# Altium PCB HSS_2026_PCB.PcbDoc (part 3 of 3)
Units mil, origin at the board's own origin, x right, y up, seen from the top; angles counter-clockwise.
Board outline 3937.01 x 3937.01 mil, 4 copper layers (SIG_1/POW, GND, PWR, SIG_2/GND), stack 22.334 mil thick; 289 components, 169 nets, 827 pads, 358 vias.
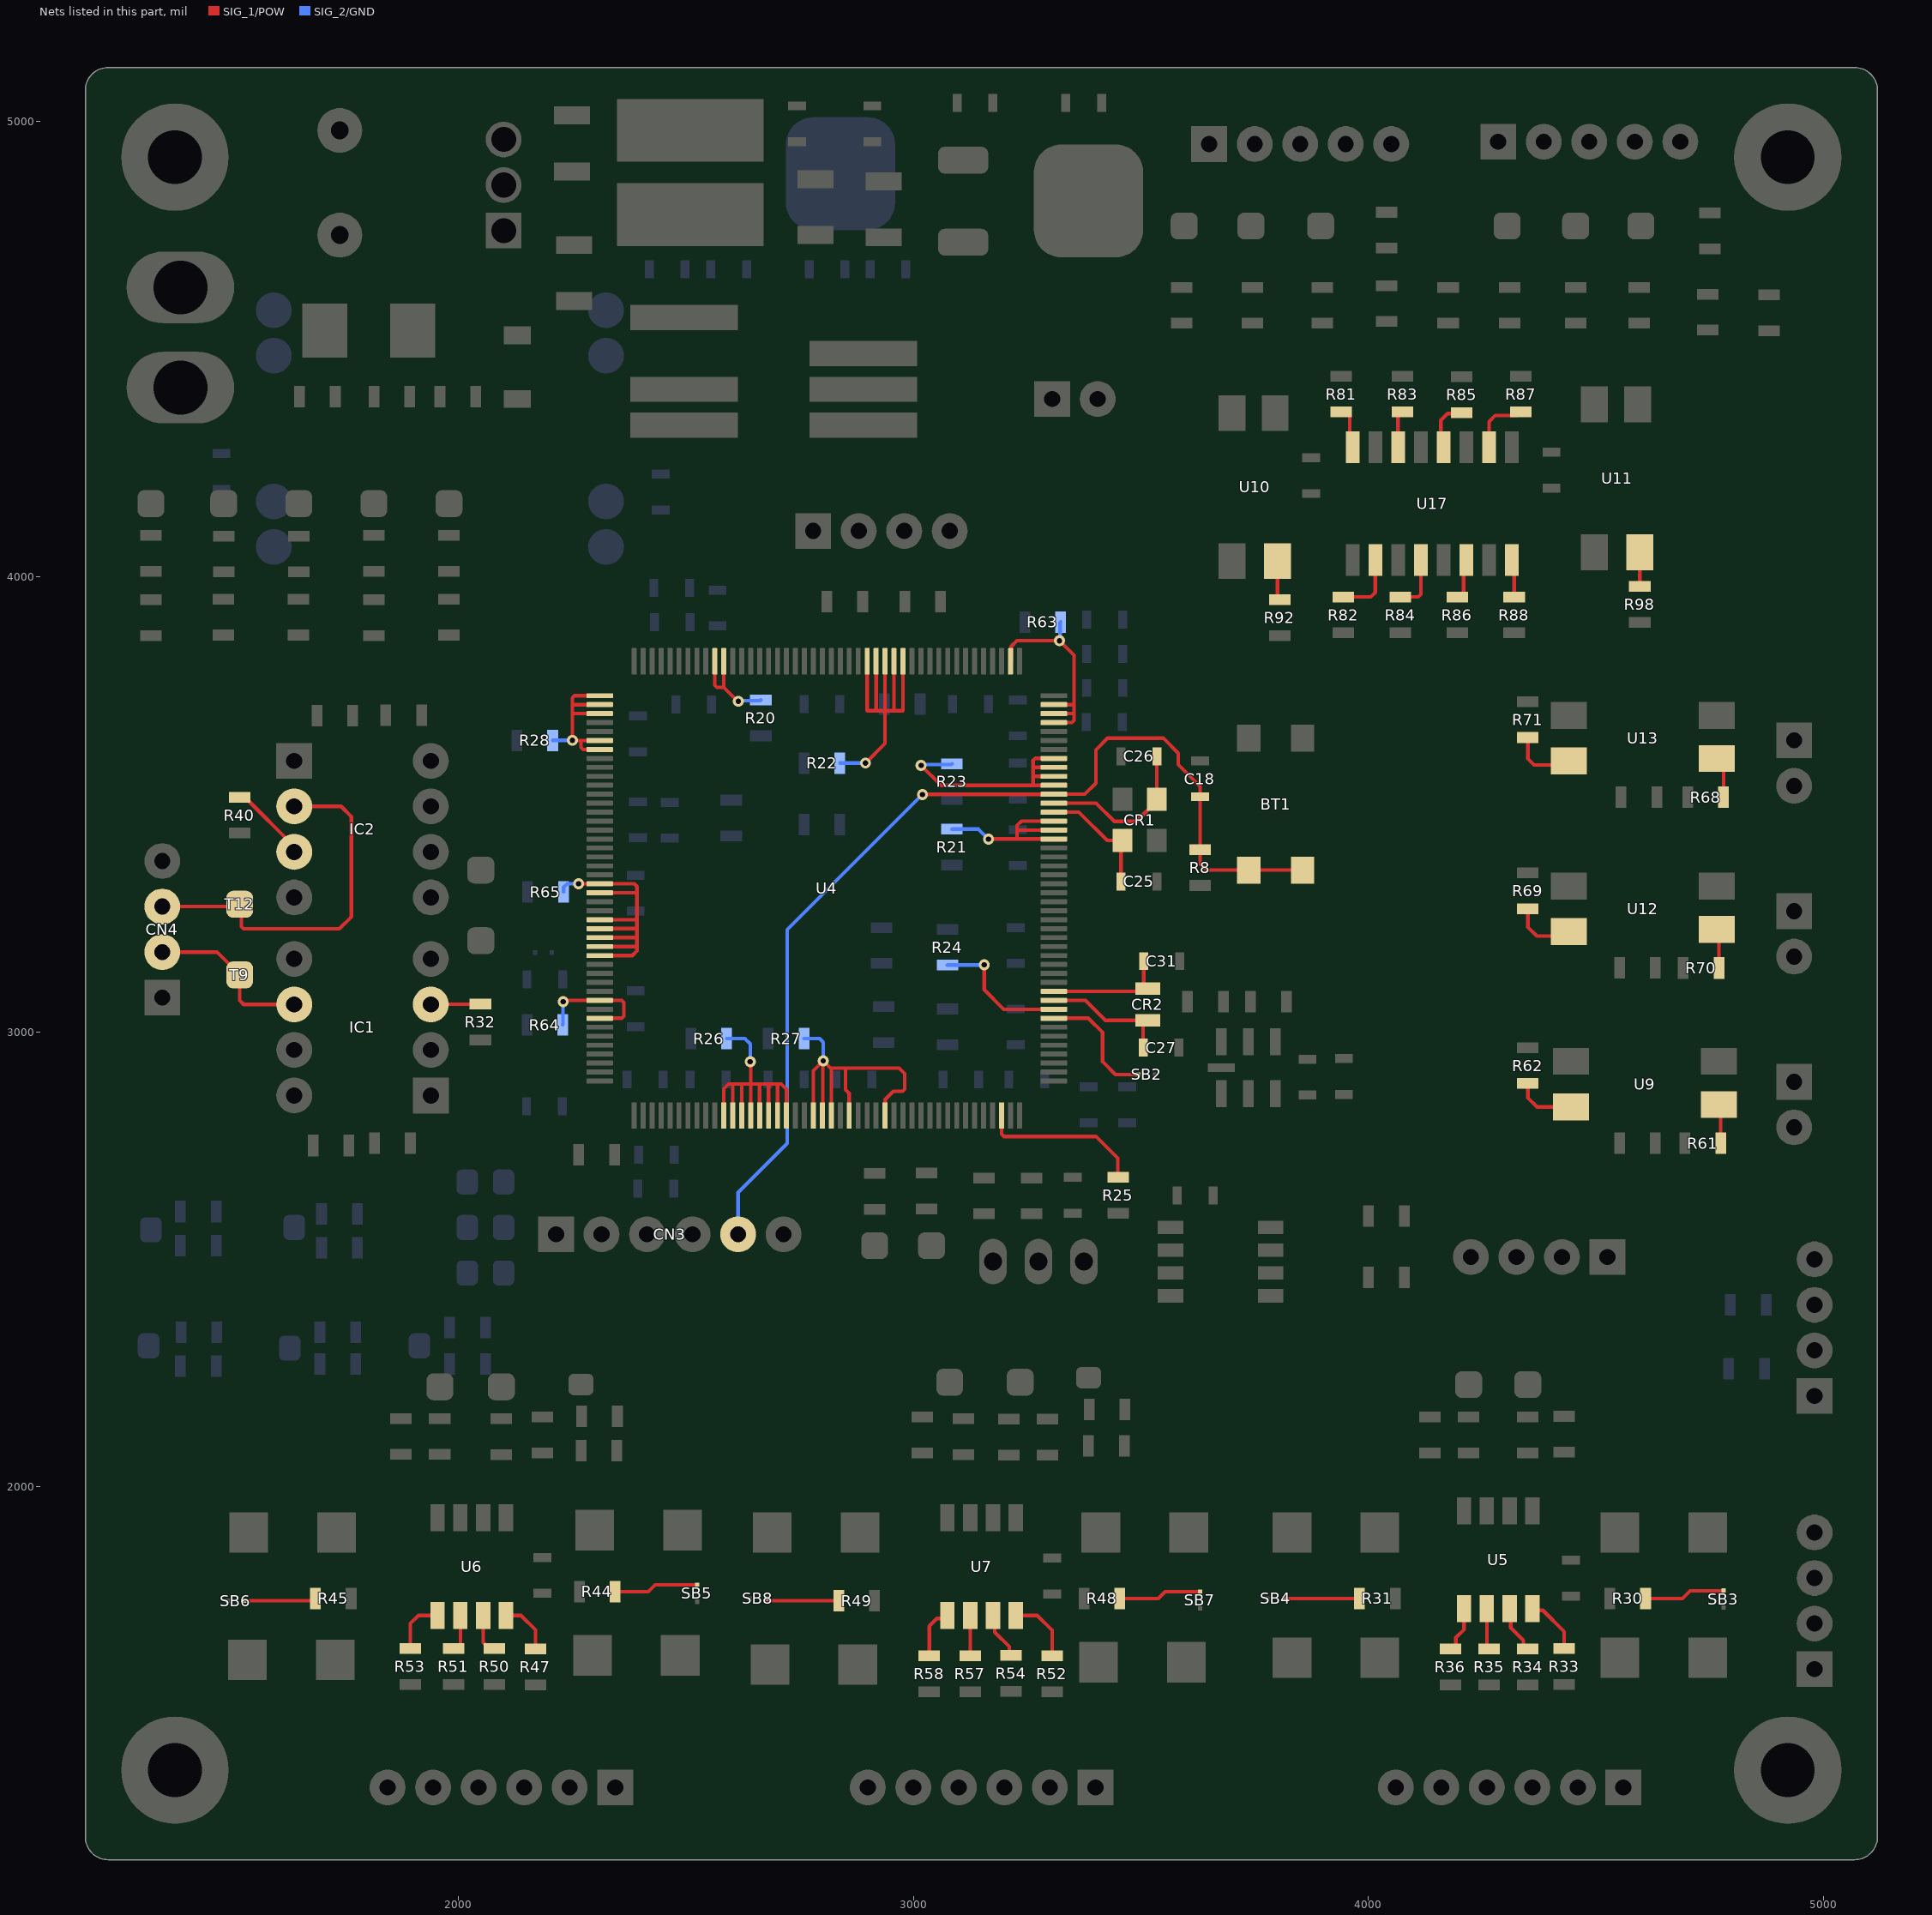
[diagram p5: the nets of this part, all layers, seen from the top]

## Via types
v1: diameter 24, hole 12, SIG_1/POW to SIG_2/GND, tented both sides, 358 vias

## Nets (pads, with @x,y where several pads share a name; then routed paths per layer and width w, separated by ;. In a path a pad name is that pad's centre, name@x,y a point inside that pad or via, vN(x,y) a via of type N, cw(c..) or ccw(c..) an arc to the next point about the centre after c; other vN are vias at no path point) (continued)
NetR20_2: R20.2 U4.78 U4.79 | length 226.9
  SIG_1/POW w8: U4.79@2563.94,3813.82 2563.94,3761.06 2568.62,3756.38 2583.62,3756.38 ; U4.78@2583.62,3813.82 2583.62,3756.38 ; v1(2615.58,3726) 2614,3726 2583.62,3756.38
  SIG_2/GND w8: v1(2615.58,3726) 2616.95,3727.37 2663.63,3727.37 R20.2@2665,3728.74
NetR21_2: R21.2 U4.28 U4.29 U4.30 | length 430.5
  SIG_1/POW w8: v1@3165,3423 v1(3165.13,3423.13) 3165.27,3423.27 3228,3423.27 ; U4.28@3308.82,3423.27 3228,3423.27 ; U4.29@3308.82,3442.95 3232.82,3442.95 3228,3438.13 ; U4.30@3308.82,3462.64 3237.64,3462.64 3228,3453 3228,3438.13 ; 3228,3423.27 3228,3438.13
  SIG_2/GND w8: R21.2@3085,3445 3143.27,3445 v1(3165.13,3423.13)
NetR22_2: R22.2 U4.58 U4.59 U4.60 U4.61 U4.62 | length 811.9
  SIG_1/POW w8: v1(2895,3590) 2937.95,3632.95 2937.95,3705 ; U4.62@2898.58,3813.82 2898.58,3705 2918.27,3705 ; U4.61@2918.27,3813.82 2918.27,3705 ; U4.60@2937.95,3813.82 2937.95,3705 ; U4.59@2957.64,3813.82 2957.64,3705 ; U4.58@2977.32,3813.82 2977.32,3705 2957.64,3705 ; 2918.27,3705 2937.95,3705 ; 2937.95,3705 2957.64,3705
  SIG_2/GND w8: R22.2@2838.74,3590 v1(2895,3590)
NetR23_2: R23.2 U4.34 U4.35 U4.36 U4.37 | length 575.2
  SIG_1/POW w8: v1(3017,3585) 3060.62,3541.38 3262,3541.38 ; U4.34@3308.82,3541.38 3262,3541.38 ; U4.35@3308.82,3561.06 3264.06,3561.06 3263,3560 ; U4.36@3308.82,3580.75 3265.87,3580.75 3263,3577.87 ; U4.37@3308.82,3600.43 3267.69,3600.43 3263,3595.75 3263,3577.87 ; 3262,3541.38 3263,3542.38 3263,3560 ; 3263,3560 3263,3577.87
  SIG_2/GND w8: v1(3017,3585) 3018.87,3586.87 3083.13,3586.87 R23.2@3085,3588.74
NetR24_2: R24.2 U4.9 | length 306.8
  SIG_1/POW w8: v1(3156,3147) 3156,3092 3198.75,3049.25 U4.9@3308.82,3049.25
  SIG_2/GND w8: R24.2@3075,3146.26 3075.37,3146.63 3155.63,3146.63 v1(3156,3147)
NetR25_2: R25.2 U4.174 | length 360.6
  SIG_1/POW w8: U4.174@3193.86,2816.18 3193.86,2775.14 3199,2770 3401,2770 3449,2722 3449,2681 R25.2@3450,2680
NetR26_2: R26.2 U4.143 U4.144 U4.145 U4.146 U4.147 U4.148 U4.149 U4.150 | length 824.3
  SIG_1/POW w8: U4.143@2583.62,2816.18 2583.62,2874.62 2594,2885 2603,2885 ; U4.144@2603.31,2816.18 2603.31,2884.69 2603,2885 ; U4.145@2622.99,2816.18 2622.99,2884.85 2622.84,2885 ; v1@2642,2934 2642.68,2933.32 2642.68,2885 ; U4.146@2642.68,2816.18 2642.68,2885 ; U4.147@2662.36,2816.18 2662.36,2884.36 2663,2885 ; U4.148@2682.05,2816.18 2682.05,2880.55 2686.5,2885 ; U4.149@2701.73,2816.18 2701.73,2881.52 2698.25,2885 ; U4.150@2721.42,2816.18 2721.42,2873.58 2710,2885 2698.25,2885 ; 2603,2885 2622.84,2885 ; 2622.84,2885 2642.68,2885 ; 2642.68,2885 2663,2885 ; 2663,2885 2686.5,2885 ; 2686.5,2885 2698.25,2885
  SIG_2/GND w8: R26.2@2590,2985 2630,2985 2641.79,2973.21 v1(2641.79,2934.21)
NetR27_2: R27.2 U4.153 U4.154 U4.155 U4.157 U4.161 | length 858.3
  SIG_1/POW w8: U4.153@2780.47,2816.18 2780.47,2914.47 v1@2801.08,2935.08 ; U4.154@2800.16,2816.18 2801.08,2817.1 v1@2801.08,2935.08 ; U4.155@2819.84,2816.18 2819.84,2918.16 2818,2920 ; U4.157@2859.21,2816.18 2859.21,2864.29 2850.9,2872.6 2850.9,2920 ; U4.161@2937.95,2816.18 2938.13,2816.35 2938.13,2851.13 2956,2869 2976.31,2869 2981,2873.69 2981,2908 2969,2920 2850.9,2920 ; v1@2801.08,2935.08 v1(2802,2936) 2818,2920 ; 2818,2920 2850.9,2920
  SIG_2/GND w8: R27.2@2760,2985 2794,2985 2802,2977 v1(2802,2936)
NetR28_2: R28.2 U4.89 U4.90 U4.91 U4.94 U4.95 | length 439.8
  SIG_1/POW w8: v1(2251,3640) v1@2251.2,3639.8 ; U4.95@2311.18,3620.12 2274.69,3620.12 2270,3624.8 2270,3638.8 2269,3639.8 ; U4.94@2311.18,3639.8 2269,3639.8 ; U4.91@2311.18,3698.86 2253.06,3698.86 2251.2,3697 ; U4.90@2311.18,3718.54 2254.47,3718.54 2251.2,3715.27 ; U4.89@2311.18,3738.23 2255.88,3738.23 2251.2,3733.54 2251.2,3715.27 ; v1@2251.2,3639.8 2251.2,3697 ; v1@2251.2,3639.8 2269,3639.8 ; 2251.2,3697 2251.2,3715.27
  SIG_2/GND w8: R28.2@2207.74,3640 v1(2251,3640)
NetR30_1: R30.1 SB3.2 | length 178.3
  SIG_1/POW w8: R30.1@4608.74,1755 4689.78,1755 4706.78,1772 SB3.2@4780,1772
NetR31_1: R31.1 SB4.2 | length 165
  SIG_1/POW w8: SB4.2@3815,1755 R31.1@3980,1755
NetR32_2: IC1.3 R32.2 | length 109.3
  SIG_1/POW w8: IC1.3@1940,3060 1940.37,3060.37 2048.63,3060.37 R32.2@2049,3060.74
NetR33_2: R33.2 U5.8 | length 128
  SIG_1/POW w8: U5.8@4360,1732.75 4363.81,1728.94 4383.06,1728.94 4430,1682 R33.2@4430,1645
NetR34_2: R34.2 U5.7 | length 106.8
  SIG_1/POW w8: U5.7@4310,1732.75 4312.53,1730.22 4312.53,1690.47 4340.14,1662.86 4340.14,1651.55 4347.95,1643.74 R34.2@4350,1643.74
NetR35_2: R35.2 U5.6 | length 91.1
  SIG_1/POW w8: U5.6@4260,1732.75 4260,1648.74 R35.2@4265,1643.74
NetR36_2: R36.2 U5.5 | length 103.8
  SIG_1/POW w8: R36.2@4180,1643.74 4184,1643.74 4191.81,1651.55 4191.81,1669 4210,1687.19 U5.5@4210,1732.75
NetR40_2: IC2.3 R40.2 | length 176.6
  SIG_1/POW w8: R40.2@1520,3515 1531.81,3515 1640,3406.81 IC2.3@1640,3395
NetR44_1: R44.1 SB5.2 | length 186.2
  SIG_1/POW w8: R44.1@2345,1770 2418,1770 2433,1785 SB5.2@2525,1785
NetR45_1: R45.1 SB6.2 | length 158.3
  SIG_1/POW w8: SB6.2@1530,1750 1681.26,1750 R45.1@1686.26,1755
NetR47_2: R47.2 U6.8 | length 120.4
  SIG_1/POW w8: U6.8@2105,1717.75 2138.25,1717.75 2170,1686 R47.2@2170,1643.74
NetR48_1: R48.1 SB7.2 | length 182.5
  SIG_1/POW w8: R48.1@3453.74,1755 3538.28,1755 3553.28,1770 SB7.2@3630,1770
NetR49_1: R49.1 SB8.2 | length 161.3
  SIG_1/POW w8: SB8.2@2677,1755 2682,1750 R49.1@2836.26,1750
NetR50_2: R50.2 U6.7 | length 90
  SIG_1/POW w8: U6.7@2055,1717.75 2055,1658.19 2068.19,1645 R50.2@2080,1645
NetR51_2: R51.2 U6.6 | length 83.2
  SIG_1/POW w8: R51.2@1990,1645 1997.19,1645 2005,1652.81 U6.6@2005,1717.75
NetR52_2: R52.2 U7.8 | length 149.8
  SIG_1/POW w8: U7.8@3225,1717.75 3272.25,1717.75 3305,1685 R52.2@3305,1628.74
NetR53_2: R53.2 U6.5 | length 122.4
  SIG_1/POW w8: R53.2@1895,1645 1895,1700 1912.75,1717.75 U6.5@1955,1717.75
NetR54_2: R54.2 U7.7 | length 104.3
  SIG_1/POW w8: U7.7@3175,1717.75 3179.09,1713.66 3179.09,1680.91 3210.88,1649.12 3210.88,1634.12 R54.2@3215,1630
NetR57_2: R57.2 U7.6 | length 89
  SIG_1/POW w8: R57.2@3125,1628.74 U7.6@3125,1717.75
NetR58_2: R58.2 U7.5 | length 115.1
  SIG_1/POW w8: R58.2@3035,1628.74 3035,1694 3051.94,1710.94 3068.19,1710.94 U7.5@3075,1717.75
NetR61_1: R61.1 U9.3 | length 86.5
  SIG_1/POW w8: U9.3@4770,2840 4773.74,2836.26 R61.1@4773.74,2755
NetR62_2: R62.2 U9.2 | length 134.5
  SIG_1/POW w8: R62.2@4350,2886.26 4350,2855 4370,2835 U9.2@4445,2835
NetR63_2: R63.2 U4.41 U4.42 U4.43 U4.46 | length 510.1
  SIG_1/POW w8: U4.46@3213.54,3813.82 3215.06,3815.33 3215.06,3846.48 3227.57,3859 v1(3321,3859) 3353,3827 3353,3720 ; U4.41@3308.82,3679.17 3348.31,3679.17 3353,3683.86 3353,3699 ; U4.42@3308.82,3698.86 3352.86,3698.86 3353,3699 ; U4.43@3308.82,3718.54 3351.54,3718.54 3353,3720 ; 3353,3699 3353,3720
  SIG_2/GND w8: v1(3321,3859) 3322.37,3860.37 3322.37,3898.63 R63.2@3323.74,3900
NetR64_2: R64.2 U4.123 U4.125 | length 272.4
  SIG_1/POW w8: v1(2231,3066) 2233.76,3068.76 2311.01,3068.76 2311.24,3069 2359.31,3069 2364,3064.31 2364,3034.25 2359.31,3029.57 U4.125@2311.18,3029.57
  SIG_2/GND w8: R64.2@2230,3015 2230.5,3015.5 2230.5,3065.5 v1(2231,3066)
NetR65_2: R65.2 U4.110 U4.111 U4.114 U4.115 U4.116 U4.117 U4.118 | length 814.1
  SIG_1/POW w8: v1@2265,3325 2265.16,3324.84 U4.110@2311.18,3324.84 2387.13,3324.84 2393,3319 2393,3305 ; U4.118@2311.18,3167.36 2382.36,3167.36 2393,3178 2393,3187 ; U4.117@2311.18,3187.05 2392.95,3187.05 2393,3187 ; U4.116@2311.18,3206.73 2392.73,3206.73 2393,3207 ; U4.115@2311.18,3226.42 2392.58,3226.42 2393,3226 ; U4.114@2311.18,3246.1 2392.9,3246.1 2393,3246 ; U4.111@2311.34,3305 U4.111@2311.18,3305.16 2392.84,3305.16 2393,3305 ; 2393,3187 2393,3207 ; 2393,3207 2393,3226 ; 2393,3226 2393,3246 ; 2393,3246 2393,3305
  SIG_2/GND w8: R65.2@2231.74,3307 2231.74,3317.32 2239.55,3325.13 v1(2264.87,3325.13)
NetR68_1: R68.1 U13.3 | length 91.2
  SIG_1/POW w8: U13.3@4765,3600 4780,3585 R68.1@4780,3515
NetR69_1: R69.1 U12.2 | length 142.4
  SIG_1/POW w8: R69.1@4350,3270 4350,3230 4370,3210 4430,3210 U12.2@4440,3220
NetR70_1: R70.1 U12.3 | length 87.1
  SIG_1/POW w8: U12.3@4765,3225 4770,3220 R70.1@4770,3140
NetR71_1: R71.1 U13.2 | length 145.8
  SIG_1/POW w8: R71.1@4350,3646.26 4350,3600 4364,3586 4431,3586 U13.2@4440,3595
NetR81_1: R81.1 U17.16 | length 94.2
  SIG_1/POW w8: R81.1@3940,4361.26 3951.19,4361.26 3959,4353.45 3959,4290 U17.16@3965,4284
NetR82_2: R82.2 U17.2 | length 145.1
  SIG_1/POW w8: R82.2@3945,3955 4005,3955 4015,3965 U17.2@4015,4036
NetR83_1: R83.1 U17.14 | length 82.7
  SIG_1/POW w8: U17.14@4065,4284 4065,4353.45 4072.81,4361.26 R83.1@4075,4361.26
NetR84_2: R84.2 U17.4 | length 122.5
  SIG_1/POW w8: R84.2@4070,3955 4109,3955 4115,3961 U17.4@4115,4036
NetR85_1: R85.1 U17.12 | length 114.5
  SIG_1/POW w8: U17.12@4165,4284 4159,4290 4159,4343 4174.06,4358.06 4203.06,4358.06 R85.1@4205,4360
NetR86_2: R86.2 U17.6 | length 92.9
  SIG_1/POW w8: R86.2@4195,3955 4201.19,3955 4209,3962.81 4209,4030 U17.6@4215,4036
NetR87_1: R87.1 U17.10 | length 134.8
  SIG_1/POW w8: U17.10@4265,4284 4265,4340 4278.45,4353.45 4327.19,4353.45 R87.1@4335,4361.26
NetR88_2: R88.2 U17.8 | length 83.1
  SIG_1/POW w8: U17.8@4315,4036 4320,4031 R88.2@4320,3955
NetR92_2: R92.2 U10.2 | length 87.1
  SIG_1/POW w8: U10.2@3800,4034 3800,3954 R92.2@3805,3949
NetR98_2: R98.2 U11.2 | length 75
  SIG_1/POW w8: R98.2@4596,3978 U11.2@4596,4053
NetSB2_2: SB2.2 U4.8 | length 274
  SIG_1/POW w8: U4.8@3308.82,3029.57 3308.99,3029.74 3384.26,3029.74 3416,2998 3416,2934 3444,2906 SB2.2@3494,2906
NRST: BT1.1 BT1.4 C18.2 CN3.5 R8.1 U4.33 | length 2297.2
  SIG_1/POW w8: v1(3020,3521) 3020.52,3521.52 3308.65,3521.52 U4.33@3308.82,3521.69 3376.69,3521.69 3401,3546 3401,3619 3427,3645 3549,3645 3582,3612 3582,3587 3630,3539 C18.2@3630,3516.26 R8.1@3630,3400 3630,3369 3644,3355 BT1.1@3736.89,3355 BT1.4@3855,3355
  SIG_2/GND w8: CN3.5@2615,2555 2615,2646.77 2723,2754.77 2723,3224 v1(3020,3521)
PC14-OSC32_IN: C27.1 CR2.2 U4.10 | length 288.2
  SIG_1/POW w8: U4.10@3308.82,3068.94 3378.06,3068.94 3422,3025 3514.78,3025 3505,3015.22 C27.1@3505,2965
PC15-OSC32_OUT: C31.1 CR2.1 U4.11 | length 272.4
  SIG_1/POW w8: U4.11@3308.82,3088.62 3508.62,3088.62 CR2.1@3515,3095 3506.26,3103.74 C31.1@3506.26,3155
PH0-OSC_IN: C25.2 CR1.3 U4.31 | length 267
  SIG_1/POW w8: U4.31@3308.82,3482.32 3363.68,3482.32 3426,3420 CR1.3@3460,3420 ; C25.2@3456.26,3330 CR1.3@3456.26,3420
PH1-OSC_OUT: C26.2 CR1.1 U4.32 | length 359.5
  SIG_1/POW w8: U4.32@3308.82,3502.01 3401.5,3502.01 3441.51,3462 3490.19,3462 3535,3506.81 C26.2@3535,3605
YKK_RX: CN4.2 IC1.6 T9.1 | length 370.4
  SIG_1/POW w8: CN4.2@1350,3175 1470,3175 T9.1@1520,3125 1520,3069 1529,3060 IC1.6@1640,3060
YKK_TX: CN4.3 IC2.2 T12.1 | length 832.4
  SIG_1/POW w8: CN4.3@1350,3275 1515,3275 T12.1@1520,3280 1524,3276 1524,3230.69 1528.69,3226 1739,3226 1765.69,3252.69 1765.69,3472.31 1743,3495 IC2.2@1640,3495
pads on no net: IC1.1 IC1.4 IC2.1 IC2.4 U1.4 U1.5 U4.15 U15.1 U15.4 VD1.1 VD2.1 VD3.1 VD4.1

## Polygon pours and split planes (outlines as drawn)
GND_I on SIG_2/GND "GND_I_L04_P001" (solid, pour order 1): 1230,5068.11 5066,5068.11 5066,1211 1230,1211
+3.3V_I on SIG_1/POW "+3.3V_I_L01_P000" (solid, pour order 0): 1227,5068.11 5063,5068.11 5063,1211 1227,1211
+3.3V_I on PWR (split plane): 5072.8,5097.73 5077.38,5096.63 5081.73,5094.83 5085.74,5092.37 5089.32,5089.32 5092.37,5085.74 5094.83,5081.73 5096.63,5077.38 5097.73,5072.8 5098.06,5068.61 5098.01,5068.11 5098.01,1231.1 5098.06,1230.6 5097.73,1226.41 5096.63,1221.83 5094.83,1217.49 5092.37,1213.47 5089.32,1209.89 5085.74,1206.84 5081.73,1204.38 5077.38,1202.58 5072.8,1201.48 5068.61,1201.15 5068.11,1201.2 1231.1,1201.2 1230.6,1201.15 1226.41,1201.48 1221.83,1202.58 1217.49,1204.38 1213.47,1206.84 1209.89,1209.89 1206.84,1213.47 1204.38,1217.49 1202.58,1221.83 1201.48,1226.41 1201.15,1230.6 1201.2,1231.1 1201.2,5068.11 1201.15,5068.61 1201.48,5072.8 1202.58,5077.38 1204.38,5081.73 1206.84,5085.74 1209.89,5089.32 1213.47,5092.37 1217.49,5094.83 1221.83,5096.63 1226.41,5097.73 1230.6,5098.06 1231.1,5098.01 5068.11,5098.01 5068.61,5098.06
NetC1_1 on PWR (split plane): 1854.9,5027.89 1854.9,4677.11 1796.4,4618.6 1795.29,4616.95 1794.9,4615 1794.9,4472.11 1777.89,4455.1 1632.11,4455.1 1563.6,4523.6 1561.95,4524.71 1560,4525.1 1272.11,4525.1 1225.1,4572.11 1225.1,4697.89 1282.11,4754.9 1515,4754.9 1516.95,4755.29 1518.6,4756.4 1558.6,4796.4 1559.71,4798.05 1560.1,4800 1560.1,4997.89 1642.11,5079.9 1802.89,5079.9
+24V on PWR (split plane): 2467.9,4933 2467.9,4837.11 2263.4,4632.6 2262.29,4630.95 2261.9,4629 2261.9,4375.11 2122.89,4236.1 1576,4236.1 1574.05,4235.71 1572.4,4234.6 1503.89,4166.1 1466,4166.1 1464.05,4165.71 1462.4,4164.6 1423.4,4125.6 1422.29,4123.95 1421.9,4122 1421.9,4092.11 1386.89,4057.1 1260.11,4057.1 1225.1,4092.11 1225.1,4557.69 1266.4,4516.4 1268.05,4515.29 1270,4514.9 1503.9,4514.9 1503.9,4319 1504.29,4317.05 1505.4,4315.4 1531.4,4289.4 1533.05,4288.29 1535,4287.9 2001,4287.9 2002.95,4288.29 2004.6,4289.4 2031.6,4316.4 2032.71,4318.05 2033.1,4320 2033.1,4783.89 2055.11,4805.9 2157,4805.9 2158.95,4806.29 2160.6,4807.4 2187.6,4834.4 2188.71,4836.05 2189.1,4838 2189.1,4869 2188.71,4870.95 2187.6,4872.6 2144.6,4915.6 2142.95,4916.71 2141,4917.1 1865.1,4917.1 1865.1,5030 1864.71,5031.95 1863.6,5033.6 1817.31,5079.9 2467.9,5079.9
+5V_I on PWR (split plane): 2689.4,4511.4 2691.05,4510.29 2693,4509.9 3030.89,4509.9 3304.9,4235.89 3304.9,4052.11 3221.89,3969.1 2043,3969.1 2041.05,3968.71 2039.39,3967.6 1999.4,3927.6 1998.29,3925.95 1997.9,3924 1997.9,2666 1998.29,2664.05 1999.4,2662.4 2132.9,2528.89 2132.9,2417 2133.29,2415.05 2134.4,2413.4 2246.4,2301.4 2248.05,2300.29 2250,2299.9 3379,2299.9 3380.95,2300.29 3382.6,2301.4 3498.6,2417.4 3499.71,2419.05 3500.1,2421 3500.1,2670.89 3538.11,2708.9 3711.89,2708.9 3764.9,2655.89 3764.9,2420 3765.29,2418.05 3766.4,2416.4 3903.4,2279.4 3905.05,2278.29 3907,2277.9 4057,2277.9 4058.95,2278.29 4060.6,2279.4 4061.71,2281.05 4062.1,2283 4062.1,2567.89 4107.11,2612.9 4578.89,2612.9 4623.9,2567.89 4623.9,2219 4624.29,2217.05 4625.4,2215.4 4665.4,2175.4 4667.05,2174.29 4669,2173.9 4801,2173.9 4802.95,2174.29 4804.6,2175.4 4840.6,2211.4 4841.71,2213.05 4842.1,2215 4842.1,2611.89 4867.11,2636.9 5057.9,2636.9 5057.9,1533.11 5035.89,1511.1 4823,1511.1 4821.05,1510.71 4819.4,1509.6 4765.4,1455.6 4764.29,1453.95 4763.9,1452 4763.9,1306.11 4717.89,1260.1 1696.11,1260.1 1426.61,1529.6 1426.6,1529.6 1271.1,1685.11 1271.1,2798.9 1689,2798.9 1690.95,2799.29 1692.6,2800.4 1725.6,2833.4 1726.71,2835.05 1727.1,2837 1727.1,2880 1726.71,2881.95 1725.6,2883.6 1696.6,2912.6 1694.95,2913.71 1693,2914.1 1583.11,2914.1 1537.1,2960.11 1537.1,4008.89 1654.11,4125.9 2452,4125.9 2453.95,4126.29 2455.6,4127.4 2471.6,4143.4 2472.71,4145.05 2473.1,4147 2473.1,4283 2473.1,4575.9 2624.89,4575.9
NetD1_2 on PWR (split plane): 2178.9,4866.89 2178.9,4840.11 2154.89,4816.1 2053,4816.1 2051.05,4815.71 2049.4,4814.6 2024.4,4789.6 2023.29,4787.95 2022.9,4786 2022.9,4322.11 1998.89,4298.1 1537.11,4298.1 1514.1,4321.11 1514.1,4514.9 1557.89,4514.9 1626.4,4446.4 1628.05,4445.29 1630,4444.9 1780,4444.9 1781.95,4445.29 1783.6,4446.4 1803.6,4466.4 1804.71,4468.05 1805.1,4470 1805.1,4612.89 1863.6,4671.4 1864.71,4673.05 1865.1,4675 1865.1,4906.9 2138.89,4906.9
+5V on PWR (split plane): 2704.9,5073.89 2704.9,4713 2705.29,4711.05 2706.4,4709.4 2822.4,4593.4 2824.05,4592.29 2826,4591.9 3129.89,4591.9 3253.4,4468.4 3255.05,4467.29 3257,4466.9 3332.89,4466.9 3344.9,4454.89 3344.9,4317 3345.29,4315.05 3346.4,4313.4 3358.4,4301.4 3360.05,4300.29 3362,4299.9 3526,4299.9 3527.95,4300.29 3529.6,4301.4 3723.11,4494.9 4263,4494.9 4264.95,4495.29 4266.6,4496.4 4268.6,4498.4 4269.71,4500.05 4270.1,4502 4270.1,4871 4269.71,4872.95 4268.6,4874.6 4266.95,4875.71 4265,4876.1 3569.1,4876.1 3569.1,4994.9 4331.9,4994.9 4331.9,4502 4332.29,4500.05 4333.4,4498.4 4365.4,4466.4 4367.05,4465.29 4369,4464.9 4527.89,4464.9 4536.9,4455.89 4536.9,4338.11 4467.4,4268.6 4466.29,4266.95 4465.9,4265 4465.9,4209 4466.29,4207.05 4467.4,4205.4 4824.9,3847.89 4824.9,2888.1 4703.11,2888.1 4681.1,2910.11 4681.1,3801 4680.71,3802.95 4679.6,3804.6 4356.1,4128.11 4356.1,4293.89 4412.6,4350.4 4413.71,4352.05 4414.1,4354 4413.71,4355.95 4412.6,4357.6 4380.6,4389.6 4378.95,4390.71 4377,4391.1 3977,4391.1 3975.05,4390.71 3973.4,4389.6 3943.4,4359.6 3942.29,4357.95 3941.9,4356 3941.9,4159.1 3833.1,4159.1 3833.1,4303 3832.71,4304.95 3831.6,4306.6 3813.6,4324.6 3811.95,4325.71 3810,4326.1 3682,4326.1 3680.05,4325.71 3678.4,4324.6 3596.89,4243.1 3312.11,4243.1 3036.6,4518.6 3034.95,4519.71 3033,4520.1 2695.11,4520.1 2630.6,4584.6 2628.95,4585.71 2627,4586.1 2468,4586.1 2466.05,4585.71 2464.4,4584.6 2463.29,4582.95 2462.9,4581 2462.9,4283 2462.9,4149.11 2449.89,4136.1 1652,4136.1 1650.05,4135.71 1648.4,4134.6 1528.4,4014.6 1527.29,4012.95 1526.9,4011 1526.9,2958 1527.29,2956.05 1528.4,2954.4 1577.4,2905.4 1579.05,2904.29 1581,2903.9 1690.89,2903.9 1716.9,2877.89 1716.9,2839.11 1686.89,2809.1 1271.1,2809.1 1271.1,3080.89 1302.11,3111.9 1405,3111.9 1406.95,3112.29 1408.6,3113.4 1435.6,3140.4 1436.71,3142.05 1437.1,3144 1437.1,4121.89 1471.11,4155.9 1506,4155.9 1507.95,4156.29 1509.6,4157.4 1578.11,4225.9 2125,4225.9 2126.95,4226.29 2128.6,4227.4 2270.6,4369.4 2271.71,4371.05 2272.1,4373 2272.1,4626.89 2476.6,4831.4 2477.71,4833.05 2478.1,4835 2478.1,5079.9 2698.89,5079.9
GND_I on GND (split plane): 5072.8,5097.73 5077.38,5096.63 5081.73,5094.83 5085.74,5092.37 5089.32,5089.32 5092.37,5085.74 5094.83,5081.73 5096.63,5077.38 5097.73,5072.8 5098.06,5068.61 5098.01,5068.11 5098.01,1231.1 5098.06,1230.6 5097.73,1226.41 5096.63,1221.83 5094.83,1217.49 5092.37,1213.47 5089.32,1209.89 5085.74,1206.84 5081.73,1204.38 5077.38,1202.58 5072.8,1201.48 5068.61,1201.15 5068.11,1201.2 1231.1,1201.2 1230.6,1201.15 1226.41,1201.48 1221.83,1202.58 1217.49,1204.38 1213.47,1206.84 1209.89,1209.89 1206.84,1213.47 1204.38,1217.49 1202.58,1221.83 1201.48,1226.41 1201.15,1230.6 1201.2,1231.1 1201.2,5068.11 1201.15,5068.61 1201.48,5072.8 1202.58,5077.38 1204.38,5081.73 1206.84,5085.74 1209.89,5089.32 1213.47,5092.37 1217.49,5094.83 1221.83,5096.63 1226.41,5097.73 1230.6,5098.06 1231.1,5098.01 5068.11,5098.01 5068.61,5098.06
GND on GND (split plane): 4765.9,4836 4766.29,4834.05 4767.4,4832.4 4810.4,4789.4 4812.05,4788.29 4814,4787.9 4986.89,4787.9 5032.9,4741.89 5032.9,2717.11 5009.89,2694.1 4851.11,2694.1 4818.1,2727.11 4818.1,3983 4817.71,3984.95 4816.6,3986.6 4671.6,4131.6 4669.95,4132.71 4668,4133.1 3865.11,4133.1 3709.6,4288.6 3707.95,4289.71 3706,4290.1 3273.11,4290.1 3243.1,4320.11 3243.1,4442 3242.71,4443.95 3241.6,4445.6 3093.6,4593.6 3091.95,4594.71 3090,4595.1 2769,4595.1 2767.05,4594.71 2765.4,4593.6 2688.4,4516.6 2687.29,4514.95 2686.9,4513 2686.9,4134.11 2613.89,4061.1 2453,4061.1 2451.05,4060.71 2449.4,4059.6 2368.89,3979.1 1934,3979.1 1932.05,3978.71 1930.4,3977.6 1736.4,3783.6 1735.29,3781.95 1734.9,3780 1734.9,2831.11 1709.89,2806.1 1317.11,2806.1 1289.1,2834.11 1289.1,4770.89 1307.11,4788.9 1529,4788.9 1530.95,4789.29 1532.6,4790.4 1581.11,4838.9 1812.9,4838.9 1812.9,4731 1813.29,4729.05 1814.4,4727.4 1889.4,4652.4 1891.05,4651.29 1893,4650.9 2151,4650.9 2152.95,4651.29 2154.6,4652.4 2169.6,4667.4 2170.71,4669.05 2171.1,4671 2171.1,4902.89 2211.11,4942.9 2560.89,4942.9 2635.4,4868.4 2637.05,4867.29 2639,4866.9 2674.89,4866.9 2725.4,4816.4 2727.05,4815.29 2729,4814.9 3482,4814.9 3483.95,4815.29 3485.6,4816.4 3547.6,4878.4 3548.71,4880.05 3549.1,4882 3549.1,4995.89 3581.11,5027.9 4765.9,5027.9

## Other copper
SIG_1/POW:
  region net +24V: 2196,4547 2196,4623 2089,4623 2089,4480 2100,4480
  region net GND_I: 2964,4965 3056,4965 3075,4946 3067,4938 3067,4882 2964,4882
  region net GND_I: 2726,4965 2976,4965 2976,4846 2726,4846
  region net GND_I: 2749.17,4281 3010,4281 3010,4215 2751,4215
  region net GND_I: 2893.81,4439 2709,4439 2709,4263 2480,4263 2480,4010 2544,4010 2544,4215 2751,4215 2751,4384 2794.19,4384
  region net GND_I: 3044,4882 3199,4882 3199,5006 3044,5006
  region net GND: 2289,4908 2289,4835 2167,4835 2167,4909 2212,4909
  region net GND: 2294,4588 2294,4664 2216,4664 2216,4585
  region net GND: 2467,4430 2467,4523 2614,4523 2614,4384
  region net +3.3V_I: 3254,4997 3509,4997 3509,4510 3254,4510
  region net +5V_I: 3039,4478 3195,4478 3195,4208 3039,4208
  region net +5V_I: 2772,4463 3196,4463 3196,4674 2772,4674
  region net +5V_I: 2987,4793 2885,4793 2885,4671 3196,4671 3196,4795 3022,4795 2987,4795
  region net +5V: 1455,4130 1455,4190 1562,4190 1562,4131
  region net +24V: 1352,4131 1237,4131 1237,4203 1351,4203
  region net +24V: 2101,4549 2251,4549 2251,4480 2100,4480
  region net +24V: 2671,4935 2671,5068.11 1856,5068.11 1856,4935 2345,4935
  region net NetC3_2: 2308,4684.14 2308,4277 2686,4277 2686,4690.14 2633,4690.14 2633,4361 2350,4361 2350,4690.14
  region net NetC3_2: 2216,4811 2324,4811 2324,4865 2685,4865 2685,4678 2216,4678
  region net NetD1_2: 1851,4482 1851,4836 1981,4836 1981,4481
  region net NetD1_2: 1662,4419 1562,4419 1562,4325 1663,4325
  region net NetD1_1: 1717,4422 1829,4422 1829,4366 1717,4366
  region net NetQ1_1: 2139,4799 2013,4799 2013,4439 2076,4439 2076,4724 2110,4724
  region net NetQ1_1: 2013,4342 2013,4439 2195,4439 2195,4342
  region net B14_USART1_TX: 1861.53,2958.47 1844,2976 1844,2937.66
  region net NetR65_2: 2378,3305 2392,3319 2393,3319 2393,3290
  region net NetR13_2: 2383,3482 2394,3493 2394,3474 2393,3473
  region net NetR13_2: 2381,3462 2392,3473 2394,3473 2394,3453.5
  region net NetR13_2: 2381,3443 2391.5,3453.5 2394,3453.5 2394,3432
  region net NetR13_2: 2406,3384 2394,3396 2394,3374.1 2393.95,3374.06
  region net NetR13_2: 2381,3384 2394,3397 2394,3374.1 2393.95,3374.06
  region net A13_DEBUG_JTMS-SWDIO: 2315,2878 2327,2890 2302,2890
  region net NetR28_2: 2264,3699 2252.83,3710.17 2252.83,3683.17 2253,3683
  region net NetR28_2: 2264,3718 2251.2,3730.8 2251.2,3706.14
  region net NetR28_2: 2270,3624.8 2282,3636.8 2282,3641 2261.3,3641 2260.1,3639.8
  region net NetR13_2: 2378,3364 2391.31,3377.31 2393,3377.31 2393,3352
  region net NetR65_2: 2381,3187 2391,3197 2393,3197 2393,3178 2387.68,3172.68
  region net NetR65_2: 2380,3207 2389.5,3216.5 2393,3216.5 2393,3197
  region net NetR65_2: 2380,3226 2390,3236 2393,3236 2393,3216.5
  region net NetR65_2: 2380,3246 2391,3257 2393,3257 2393,3236
  region net NetC19_2: 2258,3117 2269,3128 2269,3131 2258,3142
  region net NetR15_2: 2415,2899 2400,2888 2431,2888
  region net NetR15_2: 2400,2911 2414.14,2925.14 2414.14,2899.86 2415,2899
  region net NetR15_2: 2401.76,2949.76 2412.5,2960.5 2415,2960.5 2415,2939.84
  region net NetR15_2: 2399.46,2970.64 2408.86,2980.05 2415.46,2969.64 2415.46,2961.14
  region net NetR26_2: 2642.68,2909.16 2621.51,2888 2621.51,2884.85 2662.85,2884.85 2663,2885
  region net NetR26_2: 2603,2870 2615.11,2882.11 2615.11,2886.47 2590.49,2886.47 2589.97,2885.95
  region net NetR26_2: 2623,2870 2635.39,2882.39 2635.39,2886.82 2611.99,2886.82 2610.51,2885.34
  region net NetR26_2: 2643,2870 2656.19,2883.19 2656.19,2885.52 2630.27,2885.52 2630.1,2885.34
  region net NetR26_2: 2662,2871 2674.75,2883.75 2674.75,2885 2650.64,2885 2650.55,2885.08
  region net NetR26_2: 2682,2871 2692.38,2881.38 2692.38,2885 2671.96,2885 2671.88,2885.08
  region net NetR26_2: 2702,2872 2710,2880 2710,2885 2692.38,2885
  region net NetR17_2: 2997,2767 2987.03,2757.03 2987.03,2754 2997.01,2754
  region net NetR12_2: 3123,2875 3135.31,2887.31 3136.31,2887.31 3136.31,2875
  region net NetR19_2: 3084.87,2874.87 3096,2886 3096,2875.44 3095.43,2874.87
  region net NetR12_2: 3227.02,2899.31 3217.33,2909 3226.31,2909 3227.15,2908.15
  region net NetR12_2: 3216.52,2911.46 3227.15,2911.46 3227.15,2901.25 3227.43,2900.97
  region net NetR12_2: 3227.15,2921.73 3216,2910.57 3216,2910 3225.31,2910 3227.15,2908.15
  region net NetR12_2: 3239,2971 3228.88,2960.88 3227.15,2960.88 3227.15,2970.51
  region net NetR12_2: 3239,2951 3229.12,2960.88 3227.15,2960.88 3227.15,2941.63
  region net NetR12_2: 3239,2932 3228.73,2921.73 3227.15,2921.73 3227.15,2941.63
  region net NetR12_2: 3237,2911 3227.15,2920.85 3227.15,2911.46
  region net NetR12_2: 3241.01,2910.87 3234.98,2904.85 3231.52,2901.39 3227.15,2904.85 3227.15,2911.46
  region net NetR12_2: 3136,2865 3126,2875 3136.31,2875
  region net NetR19_2: 3096,2864 3085.13,2874.87 3095.43,2874.87
  region net NetR18_2: 3253,3266 3242,3277 3239,3266
  region net NetR18_2: 3252,3285 3241,3296 3241,3275.95
  region net NetR18_2: 3250,3305 3239,3316 3239,3295.95
  region net NetR21_2: 3241,3443 3231,3453 3228,3453 3228,3430.7
  region net NetR23_2: 3263,3552 3251,3540 3263,3540
  region net NetR23_2: 3273,3542 3263,3552 3263,3541
  region net NetR23_2: 3273,3561 3263,3571 3263,3550
  region net NetR23_2: 3273,3581 3263,3591 3263,3571
  region net NetR63_2: 3340.45,3718 3353,3730.55 3353,3706.53
  region net NetR63_2: 3341.21,3697.21 3353,3709 3353,3688.28
  region net NetR14_2: 2781,3768 2769,3756 2791.37,3756
  region net NetR14_2: 2761,3769 2749,3757 2771.37,3757
  region net NetR14_2: 2702,3769 2690,3757 2712.37,3757
  region net NetR14_2: 2682,3768 2670,3756 2692.37,3756
  region net NetR14_2: 2712,3738 2726,3752 2726,3756 2692.37,3756
  region net NetR22_2: 2941.85,3693.05 2941.85,3703.05 2948.42,3703.05
  region net NetR22_2: 2934.69,3692.27 2934.69,3702.27 2928.11,3702.27
  region net NetR22_2: 2960.53,3718.13 2960.53,3708.13 2967.1,3708.13
  region net NetR22_2: 2974.57,3717.44 2974.57,3707.44 2967.99,3707.44
  region net NetR22_2: 2954.85,3717.06 2954.85,3707.06 2948.28,3707.06
  region net NetR22_2: 2934.36,3715.98 2934.36,3705.98 2927.79,3705.98
  region net NetR22_2: 2940.73,3716.44 2940.73,3706.44 2947.31,3706.44
  region net NetR22_2: 2921.71,3715.75 2921.71,3705.75 2928.28,3705.75
  region net NetR22_2: 2915,3715 2915,3705 2908.43,3705
  region net NetR22_2: 2900,3715 2900,3705 2908.43,3705
  region net NetC1_1: 1775,4455 1800,4480 1800,4655 1765,4690 1590,4690 1550,4650 1550,4455
SIG_2/GND:
  region net GND: 2510,4766 2664,4766 2664,4689 2751,4689 2751,4741 2699,4741 2699,4867 2509,4867
  region net GND: 2471,4190 2117,4190 2117,3973 2396,3973 2396,4017 2472,4017
  region net GND: 1558,4266 1687,4266 1687,3723 1558,3723
  region net +3.3V: 2718,4763 2718,5092 2962,5092 2962,4761 2926,4761 2926,4639 2816,4639 2816,4762
  region net +5V: 2465,4220.58 2465,4295 2250,4295 2250,4219.42
  region net +5V: 2572,4737 2436,4737 2436,4705 2538,4705 2538,4627 2446,4627 2446,4592 2572,4592
  region net +5V: 2620,5005 2286,5005 2286,4440 2446,4440 2446,4895 2621,4895
  region net +24V: 1500,4182 1500,4235 1380,4235 1380,4182
  region net +24V: 1644,4446 1534,4446 1534,4623 2200,4623 2200,4528 1644,4528 1644,4525
  region net NetR65_2: 2252.21,3325.13 2239.24,3312.16 2231.74,3312.16 2231.74,3317.32 2235.65,3321.23
  region net NetR22_2: 2850.1,3603.27 2850.1,3593.27 2856.67,3593.27
  region net NetR22_2: 2849.84,3577.19 2849.84,3587.19 2856.41,3587.19
GND (plane layer: these items are gaps in the copper):
  lines w10: 1284,2832 1315,2801 1383,2801 1712,2801 1740,2829 1740,3780 1934,3974 2371,3974 2453,4056 2616,4056 2692,4132 2692,4513 2769,4590 3090,4590 3238,4442 3238,4318 3271,4285 3706,4285 3863,4128 4668,4128 4813,3983 4813,2725 4849,2689 5012,2689 5038,2715 5038,4744 4989,4793 4814,4793 4771,4836 4771,5033 3579,5033 3544,4998 3544,4882 3482,4820 2729,4820 2677,4872 2639,4872 2563,4948 2280,4948 2209,4948 2166,4905 2166,4671 2151,4656 1893,4656 1818,4731 1818,4844 1579,4844 1529,4794 1305,4794 1284,4773 1284,2832
PWR (plane layer: these items are gaps in the copper):
  lines w10: 1509,4516 1509,4319 1535,4293 2001,4293 2028,4320 2028,4786 2053,4811 2157,4811 2184,4838 2184,4869 2141,4912 1861,4912 ; 1220,4570 1220,4090 1258,4052 1389,4052 1427,4090 1427,4122 1466,4161 1506,4161 ; 1220,4570 1220,4700 1280,4760 1515,4760 1555,4800 1555,5000 1640,5085 1805,5085 ; 1220,4570 1270,4520 1560,4520 1630,4450 1780,4450 1800,4470 1800,4615 1860,4675 1860,5030 1805,5085 ; 1266,2804 1266,1683 1423,1526 1694,1255 2691,1255 4720,1255 4769,1304 4769,1452 4823,1506 5038,1506 5063,1531 5063,2642 4865,2642 4837,2614 4837,2215 4801,2179 4669,2179 4629,2219 4629,2570 4581,2618 4105,2618 4057,2570 4057,2283 3907,2283 3770,2420 3770,2658 3714,2714 3536,2714 3495,2673 3495,2421 3379,2305 2250,2305 2138,2417 2138,2531 2003,2666 2003,3924 2043,3964 3224,3964 3310,4050 3310,4238 ; 1266,2804 1266,3083 1300,3117 1405,3117 1432,3144 1432,4124 1469,4161 1506,4161 ; 1266,2804 1689,2804 1722,2837 1722,2880 1693,2909 1581,2909 1532,2958 1532,4011 1652,4131 2452,4131 2468,4147 2468,4283 2468,4581 2627,4581 2693,4515 3033,4515 3310,4238 ; 1506,4161 1576,4231 ; 1506,4161 1576,4231 ; 1576,4231 2125,4231 ; 1576,4231 2125,4231 ; 1805,5085 2473,5085 ; 2125,4231 2267,4373 ; 2125,4231 2267,4373 ; 2267,4373 2267,4629 ; 2267,4373 2267,4629 ; 2267,4629 2473,4835 ; 2267,4629 2473,4835 ; 2473,4835 2473,5085 ; 2473,4835 2473,4933 2473,5085 ; 2473,5085 2701,5085 2710,5076 2710,4713 2826,4597 3132,4597 3257,4472 3335,4472 3350,4457 3350,4317 3362,4305 3526,4305 3721,4500 4263,4500 4265,4502 4265,4871 3563,4871 3564,4872 3564,5000 3597,5000 4337,5000 4337,4502 4369,4470 4530,4470 4542,4458 4542,4336 4471,4265 4471,4209 4830,3850 4830,2883 4701,2883 4676,2908 4676,3801 4351,4126 4351,4296 4409,4354 4377,4386 3977,4386 3947,4356 3947,4154 3828,4154 3828,4303 3810,4321 3682,4321 3599,4238 3310,4238

## Silkscreen, mask and mechanical layers (free items; w line width, h text height)
Top Overlay:
  lines w5: 1285,4215 1365,4215 ; 1445,4215 1525,4215 ; 1610,4215 1690,4215 ; 1775,4215 1855,4215 ; 1905,2270 2015,2270 ; 1940,4210 2020,4210 ; 2035,2270 2175,2270 ; 2200,2270 2340,2270 ; 2855,2480 2960,2480 ; 2985,2480 3105,2480 ; 3015,2280 3125,2280 ; 3160,2280 3300,2280 ; 3310,2280 3450,2280 ; 4180,2275 4260,2275 ; 4310,2275 4390,2275
  lines w10: 1160,2655 1955,2655 1955,2765 2170,2765 2170,3810 2105,3810 1160,3810 ; 1470,1490 1470,2015 ; 2590,1200 2590,2360 ; 3415,2360 3760,2360 4475,2360 4820,2360 4820,2015 ; 3420,2360 2590,2360 ; 3545,4515 3545,3820 5040,3820 5040,4810 ; 3720,1200 3720,2360 ; 4175,2965 4175,3785 5145,3785 ; 4175,2970 4175,2620 5140,2620 ; 4175,3020 4820,3020 ; 4175,3740 4175,3395 4820,3395 ; 4820,1480 4820,2015 ; 1470,2015 1470,2015 ; 1470,2015 1470,2360 2245,2360 2590,2360 ; 4820,2015 4820,2015
  text "M1I1" at 3685,4705 h40 r90
  text "M2I1" at 4395,4705 h40 r90
  text "M2I2" at 4545,4690 h40 r90
  text "M1I2" at 3835,4685 h40 r90
  text "M1PWM" at 3985,4645 h40 r90
  text "M2PWM" at 4690,4645 h40 r90
  text "FAN" at 3250,4525 h60
  text "5_I" at 1765,4231.66 h40
  text "24" at 1290,4230 h40
  text "5" at 1475,4230 h40
  text "3.3" at 1595,4230 h40
  text "3.3_I" at 1910,4226.66 h40
  text "Motor / Surucu" at 4638.06,4105 h60
  text "BOS / UART" at 3175,4010 h60
  text "YKK" at 1230,3635 h60
  text "SILAH" at 4301,3421 h60 r90
  text "RX" at 2015,3410 h40
  text "TXD" at 1470,3335 h40
  text "TX" at 2020,3255 h40
  text "RESET" at 3700,3235 h40
  text "RXD" at 1470,3180 h40
  text "LAZER" at 4304.28,3049.34 h60 r90
  text "NISAN" at 4304,2658 h60 r90
  text "BOS / UART" at 3910,2625 h60
  text "SCL" at 2860,2425 h40
  text "SDA" at 2990,2425 h40
  text "BOS / I2C" at 4845,2395 h60 r90
  text "3.3/DIO/CLK/IO/RST/GND" at 2005,2390 h40
  text "SCK" at 3020,2295 h40
  text "MISO" at 3160,2295 h40
  text "MOSI" at 3320,2295 h40
  text "TX" at 4185,2290 h40
  text "RX" at 4315,2290 h40
  text "SCK" at 1910,2285 h40
  text "MISO" at 2035,2285 h40
  text "MOSI" at 2210,2285 h40
  text "RS422  / TTL" at 3790,2100 h60
  text "Enkoder 1" at 2618.06,2085 h60
  text "Enkoder 2" at 1488.06,2080 h60
  text "OLED" at 4835,1990 h60
Bottom Overlay:
  lines w10: 1890,2520 2105,2520 ; 1890,2620 2105,2620
  text "3.3I" at 1980,2650 h40
  text "GND" at 1980,2545 h40
  text "PD15" at 1660,2490 h40
  text "PD13" at 1350,2485 h40
  text "5VI" at 1980,2445 h40
  text "PD14" at 1350,2230 h40
  text "PC6" at 1935,2230 h40
  text "PC8" at 1650,2225 h40
Drill Guide:
  lines w10: 1181.1,1231.1 ccw(c1231.1,1231.1) 1231.1,1181.1 4822.83,1181.1 5068.11,1181.1 ccw(c5068.11,1231.1) 5118.11,1231.1 5118.11,4921.26 5118.11,5068.11 ccw(c5068.11,5068.11) 5068.11,5118.11 1231.1,5118.11 ccw(c1231.1,5068.11) 1181.1,5068.11 1181.1,1574.8 1181.1,1231.1

## Text inside footprints (layer, text, board x,y; h text height)
CARD1: Bottom Overlay "OUT-" at 2068.17,4136.01 h50 r180; Bottom Overlay "OUT+" at 2073.17,4558.19 h50 r180; Bottom Overlay "IN-" at 1668.17,4136.01 h50 r180; Bottom Overlay "IN+" at 1668.17,4558.19 h50 r180